# Altium PCB PCB1.PcbDoc
Units mil, origin at the board's own origin, x right, y up, seen from the top; angles counter-clockwise.
Board outline 6000 x 4000 mil, 2 copper layers (Top Layer, Bottom Layer); 12 components, 7 nets, 27 pads, 0 vias.
Unrouted connection lines stored in the file: 4.
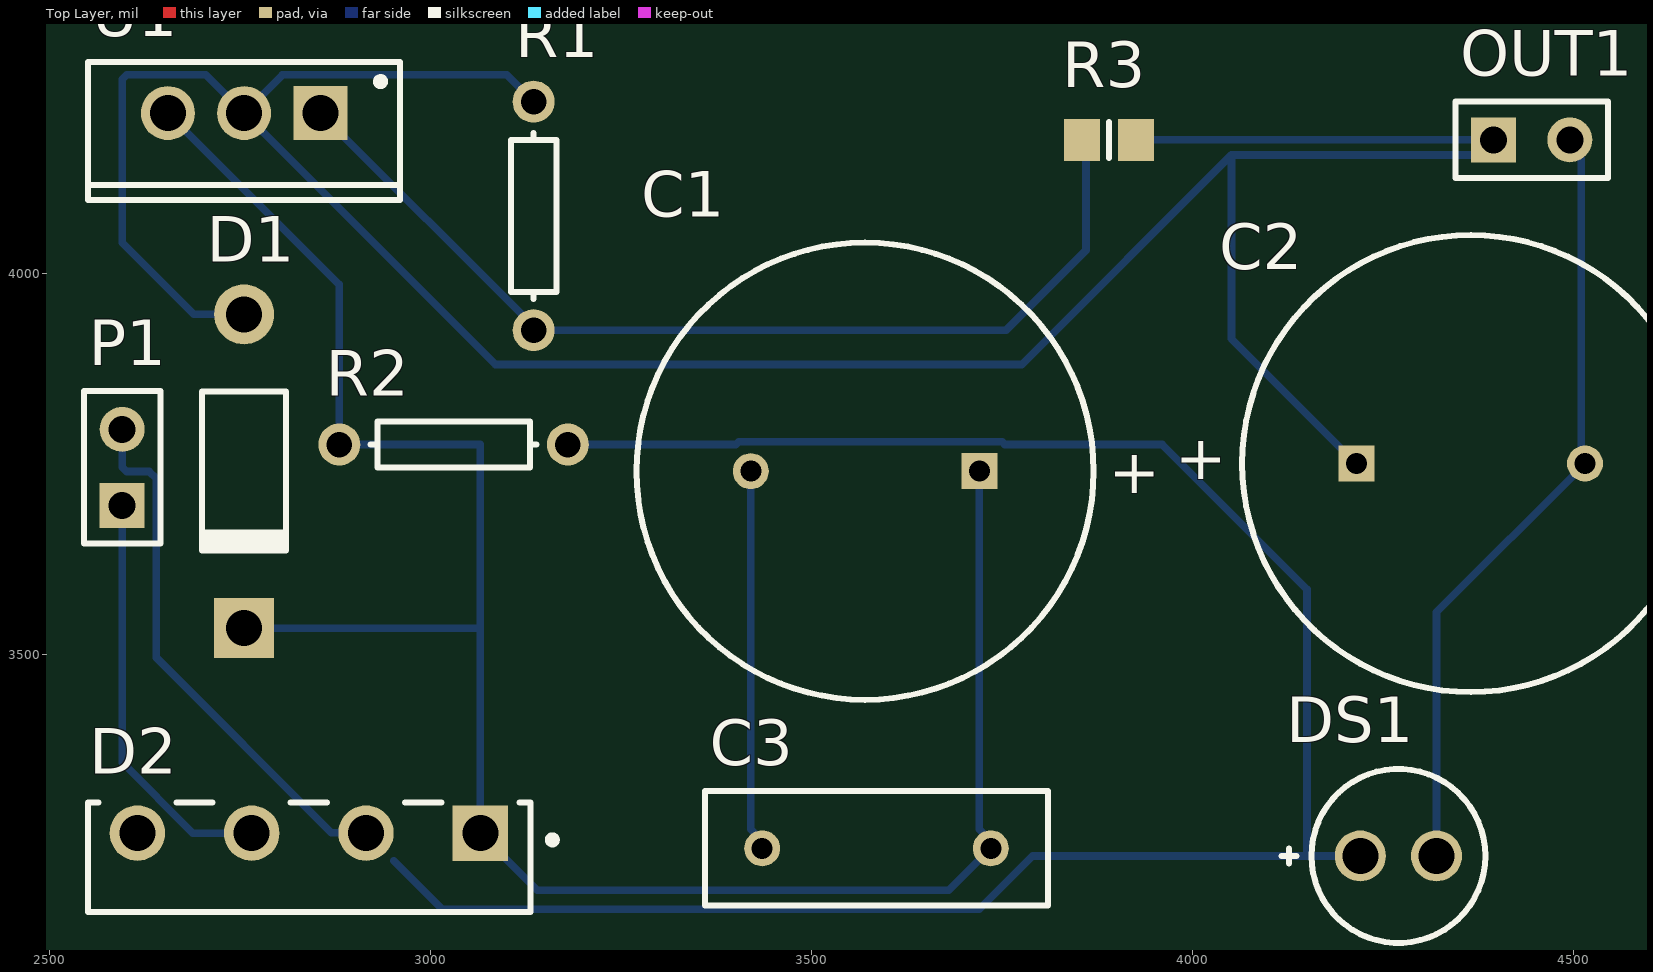
[diagram p0: Top Layer view]
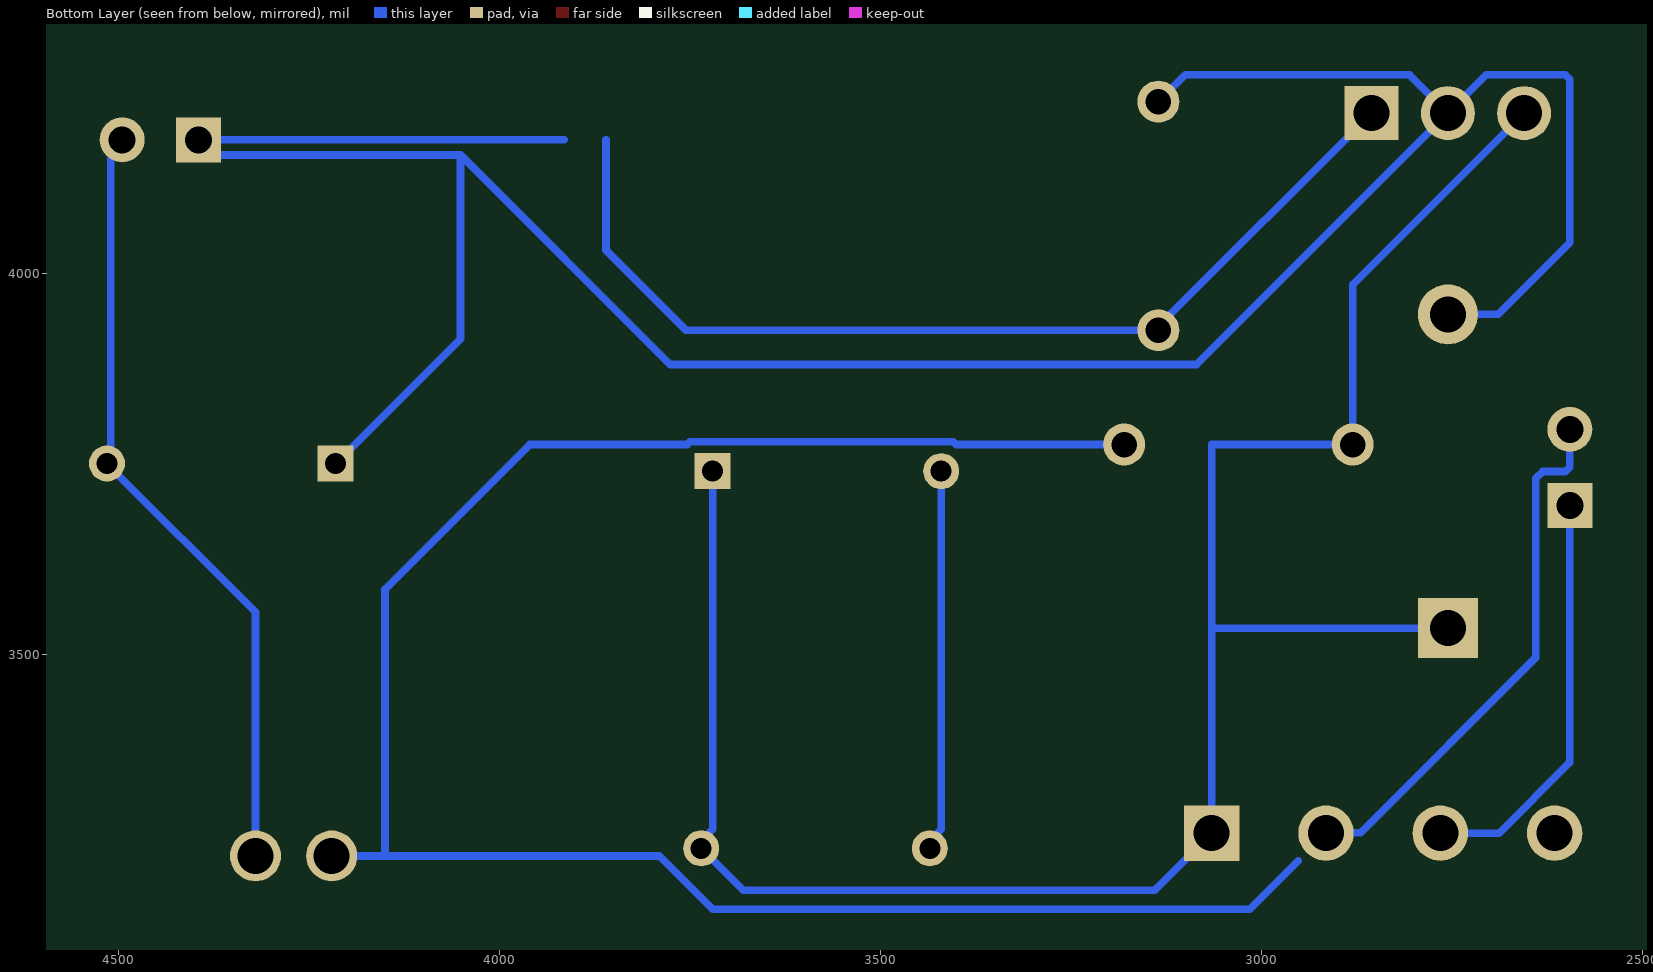
[diagram p1: Bottom Layer view, seen from below]

## Layer stack, top to bottom
Top Solder: solder mask 0.4, Solder Resist, Dk 3.5
Top Layer: signal copper 1.4
Dielectric 1: dielectric 12.6, FR-4, Dk 4.8
Bottom Layer: signal copper 1.4
Bottom Solder: solder mask 0.4, Solder Resist, Dk 3.5

## Board outline
1000,1000 7000,1000 7000,5000 1000,5000

## Design rules (kind name [scope] priority, off if disabled: settings)
Clearance [All] p1: gap=10 ignorepadtopadclearanceinfootprint=FALSE
PolygonConnect [All] p1: connectstyle=Relief reliefconductorwidth=10 reliefentries=4 polygonreliefangle="90 Angle" airgapwidth=10
RoutingVias [All] p1: holewidth=28 width=50 viastyle="Through Hole" minholewidth=28 minwidth=50 maxholewidth=28 maxwidth=50
SolderMaskExpansion [All] p1: expansion=0 istentingtop=FALSE
Width [All] p1: maxlimit=10 minlimit=10 preferedwidth=10
30 further rules are at their usual default settings.

## Components (designator, comment, footprint, x,y, rotation, side; value= is the part's Value field where it differs from the comment)
C1 "Cap Pol1" RB7.6-15 3570,3740 r0 top value=1000µF
C2 "Cap Pol1" RB7.6-15 4365,3750 r180 top value=100pF
C3 "Cap" RAD-0.3 3585,3245 r180 top value=1uF
D1 "Diode 1N4001" DO-41 2755,3740 r270 top
D2 "KBP206G" FP-KBP-MFG 2840.59,3233.5 r180 top value=25pF
DS1 "TSAL6200" VISH-TSAL6200 4270,3235 r0 top
OUT1 "OUTPUT" HDR1X2 4395,4175 r0 top
P1 "AC_INPUT" HDR1X2 2595,3695 r90 top
R1 "Res1" AXIAL-0.3 3135,4075 r90 top value=220
R2 "Res1" AXIAL-0.3 3030,3775 r180 top value=1.8K
R3 "5K" 6-0805_N 3890,4175 r0 top
U1 "LM317P" TO220FP 2755,4210 r180 top

## Footprints (in the part's own frame and the unit in brackets; to place one, negate y for a bottom-side part, rotate by r counter-clockwise, add the part's x,y. Pads: shape width x height; smd on the part's side, far side on the other; paste and mask are expansions set on the pad)
6-0805_N [mm] "Chip Resistor, Body 2.0x1.2mm, IPC Medium Density"
  rect 1.2x1.4 smd: 1(-0.9,0) 2(0.9,0)
  silkscreen extent 0,-0.6 0,0.6, body extent -1.07,-0.7 1.07,0.7, height 0.7
AXIAL-0.3 [mm] "Axial Device, Thru-Hole; 2 Leads; 0.3 in Pin Spacing"
  round 1.4 hole 0.85: 1(-3.81,0) 2(3.81,0)
  silkscreen extent -2.77,-0.76 2.77,0.76
DO-41 [mm] "Diode, Axial; Body 5.2 x 2.7 mm (LxDia. max), Lead Dia. 0.86 mm (max)"
  round 2 hole 1.2: 1(-5.23,0)
  rect 2x2 hole 1.2: 2(5.23,0)
  silkscreen extent -2.65,-1.4 2.75,1.4
FP-KBP-MFG [mm]
  rect 1.85x1.85 hole 1.2 paste-2539.97 mask+0: 1(-5.7,-0.8)
  round 1.85 hole 1.2 paste-2539.97 mask+0: 2(-1.89,-0.8) 3(1.92,-0.8) 4(5.73,-0.8)
  silkscreen extent -8.23,-1.83 7.37,1.83, body extent -7.47,-1.92 7.47,1.92, height 0.25
HDR1X2 [mm] "Connector; Header; 2 Position"
  rect 1.5x1.5 hole 0.9: 1(0,0)
  round 1.5 hole 0.9: 2(2.54,0)
  silkscreen extent -1.27,-1.27 3.81,1.27
RAD-0.3 [mm] "Radial Cap, Thru-Hole; 2 Leads; 0.3 in Pin Spacing"
  round 1.2 hole 0.7: 1(-3.81,0) 2(3.81,0)
  silkscreen extent -5.71,-1.91 5.71,1.91
RB7.6-15 [mm] "Polarized Capacitor (Radial); 2 Leads"
  rect 1.2x1.2 hole 0.7: 1(3.81,0)
  round 1.2 hole 0.7: 2(-3.81,0)
  silkscreen extent -7.62,-7.62 7.62,7.62
TO220FP [mm] "TO, Thru-Hole, Vertical, Heatsink Mounted; 3 In-Line Leads; Pitch 2.54 mm"
  rect 1.8x1.8 hole 1.2: 1(-2.54,0)
  round 1.8 hole 1.2: 2(0,0) 3(2.54,0)
  silkscreen extent -5.2,-1.7 5.2,2.9, body extent -5.25,-1.75 5.25,2.95, height 20
VISH-TSAL6200 [mm] "THD, 2-Leads, Dia 5.8mm, Pitch 2.54mm"
  round 1.7 hole 1.2: 1(-1.27,0) 2(1.27,0)
  silkscreen extent -3.9,-2.9 2.9,2.9

## Part data
C1 C2: "Polarized Capacitor (Radial)", LatestRevisionDate=17-Jul-2002, LatestRevisionNote="Re-released for DXP Platform.", PackageDescription="Polarized Capacitor (Radial); 2 Leads", PackageReference=RB7.6-15, Published=8-Jun-2000, Publisher="Altium Limited"
C3: "Capacitor", LatestRevisionDate=17-Jul-2002, LatestRevisionNote="Re-released for DXP Platform.", PackageDescription="Radial Cap, Thru-Hole; 2 Leads; 0.3 in Pin Spacing", PackageReference=RAD-0.3, Published=8-Jun-2000, Publisher="Altium Limited"
D1: "1 Amp General Purpose Rectifier", Code_JEDEC=DO-204-AL, ComponentLink1Description="Manufacturer Link", ComponentLink1URL=http://www.fairchildsemi.com/, ComponentLink2Description=Datasheet, ComponentLink2URL=http://www.fairchildsemi.com/ds/1N%2F1N4001.pdf, DatasheetVersion=1998, LatestRevisionDate=17-Jul-2002, LatestRevisionNote="Re-released for DXP Platform.", PackageDescription="Diode, Axial; Body 5.2 x 2.7 mm (LxDia. max), Lead Dia. 0.86 mm (max)", PackageReference=DO-41, PackageVersion=Aug-1999, Published=8-Jun-2000, Publisher="Altium Limited"
D2: library part CMP-12791-000035-1, "BRIDGE RECT 1PHASE 600V 2A KBP", Capacitance=25pF, Forward Current=2A, Manufacturer="Diodes Inc.", Max Junction Temp=+150°C, Max Repetitive Reverse Voltage=600V, Max Surge Forward Current=65A, Package=KBP, Peak Reverse Current=5uA, Temperature="-65°C to +150°C", Temperature Range Low=-65°C, Automotive=No, Category=Diode, ComponentLink2Description=Datasheet, ComponentLink2URL=https://www.diodes.com/assets/Datasheets/ds21205.pdf, Device Class L1="Discrete Semiconductors", Device Class L2=Diodes, Device Class L3="Rectifier Diodes", Digikey Description="BRIDGE RECT 1PHASE 600V 2A KBP", Footprint Url=https://www.diodes.com/assets/Package-Files/KBP.pdf, Height=12.8mm, Lead Free=Yes, Manufacturer Part Number=KBP206G, Mouser Description="Bridge Rectifiers 2.0A 600V", Octopart=https://octopart.com/kbp206g-diodes+inc.-330175, Reverse Voltage=600V, RoHS=TRUE, Standoff Height=1.8mm, Temperature Range High=+150°C
DS1: library part CMP-2000-07327-1, "High Power Infrared Emitting Diode, GaAlAs, MQW, 1.35 V, 100 mA, -40 to 85 degC, 2-Pin THD, RoHS, Bulk", Forward Current=100mA, Forward Voltage=3V, Manufacturer=Vishay, Operating Temp Range=-40Cto85C, Operating Temperature Classification=Industrial, Package Description="2-Pin Through Hole Device, Dia 5.8 mm, Pitch 2.54 mm", Package Type=T-13/4, Power Dissipation=160W, Reverse Voltage=5V, Chip Material=GaAlAs, Datasheet URL=http://www.vishay.com/docs/81010/tsal6200.pdf, Datasheet Version="Rev. 2.4, 03/2014", DELETED=Compliant, High Brightness=Yes, Lens Dimensions=5x5x7.7mm, Lens Type=Colored, Lum Intensity=500mW/srmcd, Luminous Intensity=500mW/sr, Main Category=IrLED, Manufacturer URL=http://www.vishay.com/, Mounting=ThroughHole, Mounting Technology=ThroughHole, Number of  Elements=1, Package Reference=TSAL6200, Packaging=Bulk, Peak Wavelength=950nm, Pin Count=2, Product Depth (mm)=5.8mm, Product Height (mm)=8.7mm, Product Length (mm)=5.8mm, Rad Hardened=No, Shape Type=Circular, Test Current (It)=100mA, Type=IrLED, Viewing Angle=34deg
OUT1 P1: library part "Header 2", "Header, 2-Pin", LatestRevisionDate=17-Jul-2002, LatestRevisionNote="Re-released for DXP Platform.", Publisher="Altium Limited"
R1 R2: "Resistor", LatestRevisionDate=17-Jul-2002, LatestRevisionNote="Re-released for DXP Platform.", PackageDescription="Axial Device, Thru-Hole; 2 Leads; 0.3 in Pin Spacing", PackageReference=AXIAL-0.3, Published=8-Jun-2000, Publisher="Altium Limited"
R3: library part "Res Varistor", "Varistor (Voltage-Sensitive Resistor)", Code_IPC=RESC2012, LatestRevisionDate=29-May-2009, LatestRevisionNote="IPC-7351 Footprint Added.", PackageDescription="Chip Resistor 0805 Case Size", PackageReference=6-0805, PackageVersion=Mar-2003, Published=24-Mar-1999, Publisher="Altium Limited"
U1: library part CMP-0244-00425-1, "1.5A, 1.2V to 37V Adjustable Voltage Regulator, 3-Pin TO-220FP", ComponentLink1Description="Manufacturer URL", ComponentLink1URL=http://www.st.com, ComponentLink2Description=Datasheet, ComponentLink2URL=http://www.st.com/internet/com/TECHNICAL_RESOURCES/TECHNICAL_LITERATURE/DATASHEET/CD00000455.pdf, DatasheetVersion=1/11/2011, PackageDescription="TO, Thru-Hole, Vertical, Heatsink Mounted; 3 In-Line Leads; Pitch 2.54 mm", PackageReference=TO220FP, PackageVersion=2011

## Nets (pads, with @x,y where several pads share a name; then routed paths per layer and width w, separated by ;. In a path a pad name is that pad's centre, name@x,y a point inside that pad or via, vN(x,y) a via of type N, cw(c..) or ccw(c..) an arc to the next point about the centre after c; other vN are vias at no path point)
NetC1_1: C1.1 C3.1 D1.2 D2.1 R2.2 U1.3 | length 2758.6
  Bottom Layer w10: U1.3 2880,3985 R2.2 3065,3775 3065,3535 ; D1.2 3064.09,3534.09 3065,3535 ; C1.1 3720,3270.08 3735,3255.08 C3.1 3680,3190 3140,3190 D2.1 3065,3535
NetC1_2: C1.2 C2.2 C3.2 D2.4 DS1.2 OUT1.2 R3.2 | length 1506.1
  Bottom Layer w10: C1.2 3420,3270.08 3435,3255.08 C3.2 ; DS1.2 4320,3555 C2.2 4510,3755 4510,4150 OUT1.2@4505,4155
NetC2_1: C2.1 D1.1 OUT1.1 R1.2 U1.2 | length 3866
  Bottom Layer w10: D1.1 2689.09,3945.91 2595,4040 2595,4254.58 2600.86,4260.43 2704.57,4260.43 U1.2 ; R1.2 3099.57,4260.43 2805.43,4260.43 U1.2 ; 3915,4175 OUT1.1 ; C2.1 4050.91,3914.09 4050.91,4155 ; OUT1.1@4405,4155 4050.91,4155 ; U1.2 3085,3880 3775.91,3880 4050.91,4155
NetD2_2: D2.2 P1.2 | length 706.4
  Bottom Layer w10: P1.2 2595,3745.39 2600.86,3739.53 2630.74,3739.53 2639.53,3730.74 2639.53,3495.47 2869.44,3265.56 2914.44,3265.56 D2.2
NetD2_3: D2.3 P1.1 | length 545.7
  Bottom Layer w10: P1.1 2595,3357.72 2687.72,3265 D2.3
NetDS1_1: DS1.1 R2.1 | length 2725.7
  Bottom Layer w10: 2951.36,3228.64 3015,3165 3720,3165 3790,3235 4150,3235 ; R2.1 3400.38,3775 3404,3778.62 3749.84,3778.62 3753.46,3775 3960,3775 4150,3585 4150,3235 ; DS1.1 4150,3235
NetR1_1: R1.1 R3.1 U1.1 | length 1314.5
  Bottom Layer w10: U1.1 3135,3930 R1.1 3755,3925 3860,4030 3860,4175

## Text inside footprints (layer, text, board x,y; h text height)
C1: Top Overlay "+" at 3890.15,3710.99 h59.06
C2: Top Overlay "+" at 4044.85,3779.01 h59.06 r180